# Altium PCB ADS1299-V3.PcbDoc (part 2 of 3)
Units mm, origin at the board's own origin, x right, y up, seen from the top; angles counter-clockwise.
Board outline 93.01 x 69.99 mm, 4 copper layers (Top, GND, POWER, Bottom), stack 0.603 mm thick; 198 components, 137 nets, 685 pads, 384 vias.
Unrouted connection lines stored in the file: 1.
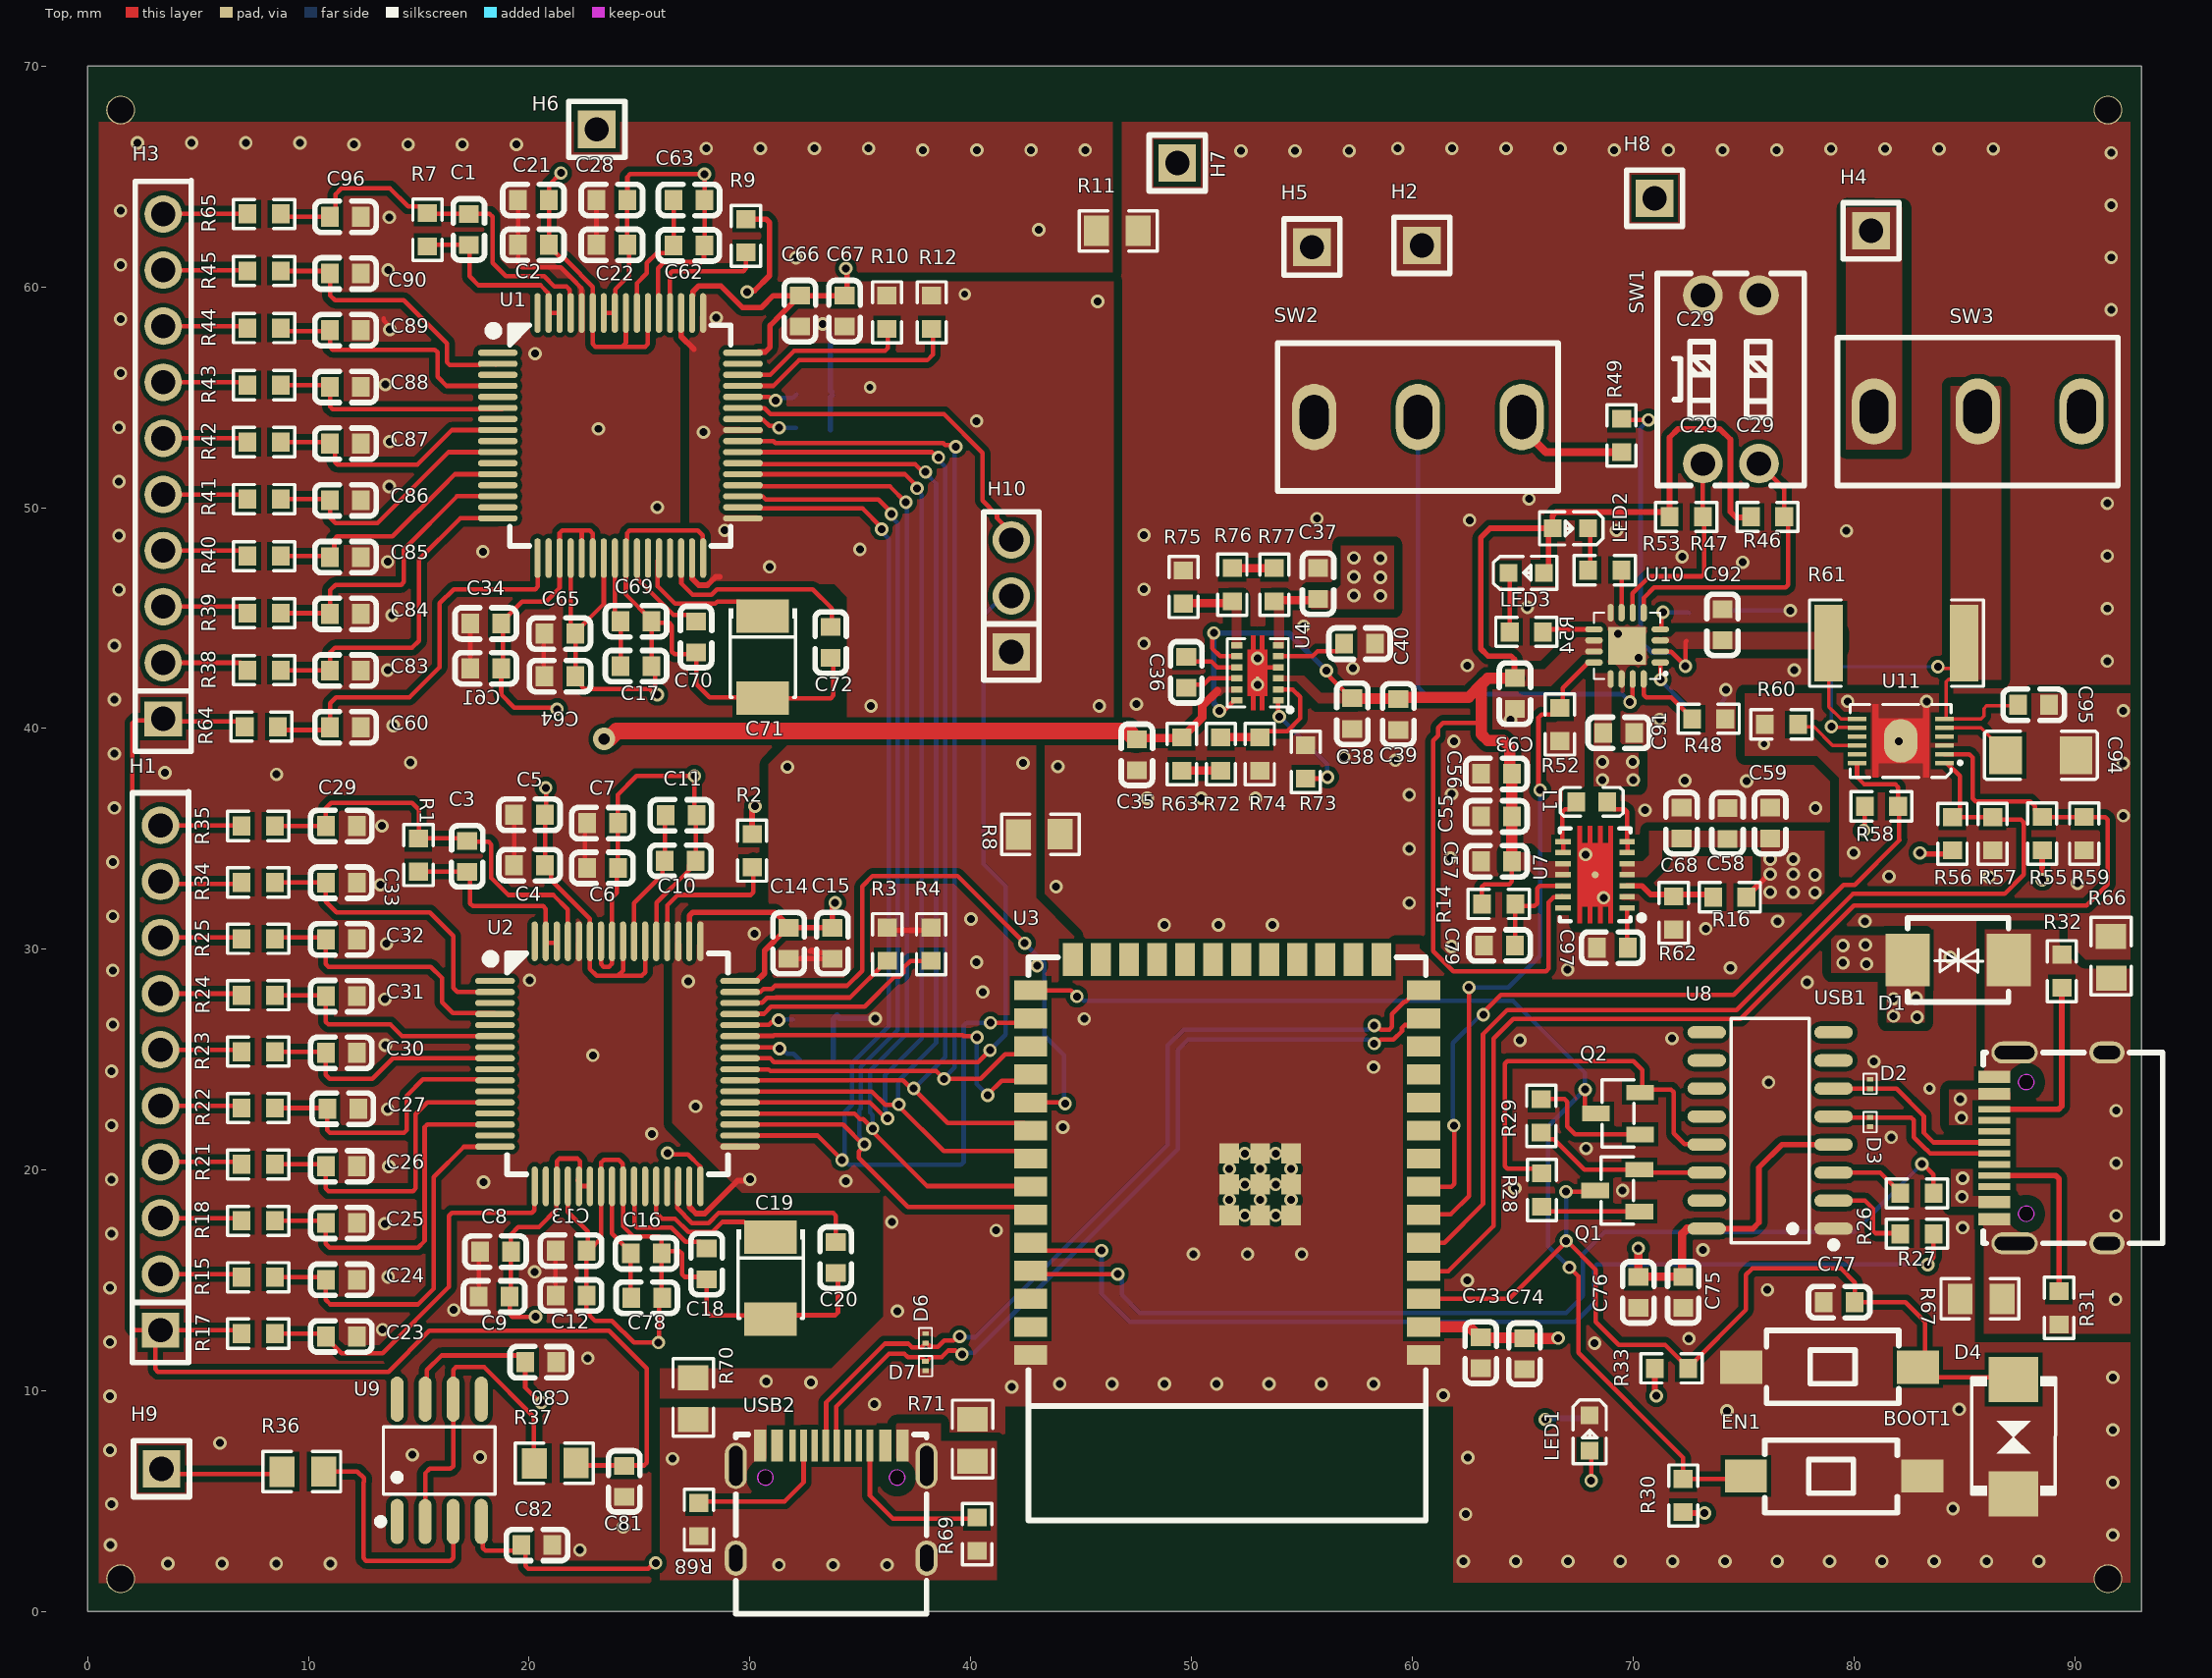
[diagram p0: Top view]

## Via types
v1: diameter 0.61, hole 0.356, Top to Bottom, tented both sides, 357 vias
v2: diameter 0.61, hole 0.356, Top to Bottom, 22 vias
v3: diameter 0.559, hole 0.305, Top to Bottom, 4 vias
v4: diameter 1.016, hole 0.508, Top to Bottom, tented both sides, 1 vias

## Nets (pads, with @x,y where several pads share a name; then routed paths per layer and width w, separated by ;. In a path a pad name is that pad's centre, name@x,y a point inside that pad or via, vN(x,y) a via of type N, cw(c..) or ccw(c..) an arc to the next point about the centre after c; other vN are vias at no path point) (continued)
AVSS: (continued)
  Top w0.203: U9.4@17.831,4.086 17.904,4.012 17.904,2.888 18.023,2.769 19.403,2.769 C82.1@19.657,3.023 19.837,2.842 19.837,2.075 19.956,1.956 25.4,1.956 v1@25.603,2.159 ; U2.20@21.753,19.266 21.753,18.114 22.651,17.215 C13.1@22.651,16.185 ; U1.20@21.88,47.714 21.88,44.465 C65.1@22.022,44.323 ; C65.1@22.123,44.12 22.098,44.094 C64.1@22.098,42.367 22.396,42.069 22.396,41.902 22.515,41.783 25.451,41.783 25.546,41.688 25.551,41.688 25.73,41.509 v1@25.73,41.504 ; C65.1@22.2,44.221 22.2,44.46 23.38,45.641 U1.23@23.38,47.714 ; C13.1@22.595,16.129 22.595,13.571 22.983,13.183 23.752,13.183 24.742,12.192 25.883,12.192 25.883,14.083 C78.1@26.024,14.224 25.998,14.249 C16.1@25.998,16.231 ; C13.1@22.936,16.586 23.253,16.903 U2.23@23.253,19.266 ; U2.23@23.241,19.685 23.268,19.712 23.268,20.347 23.392,20.471 24.056,20.471 24.238,20.288 24.238,19.281 U2.25@24.253,19.266 24.253,17.456 24.718,16.99 25.879,16.99 25.998,16.871 C16.1@25.998,16.231 ; U2.58@23.253,30.366 23.253,29.329 23.372,29.21 23.619,29.21 23.738,29.329 23.738,30.351 U2.57@23.753,30.366 23.753,32.338 23.978,32.563 C6.1@23.978,33.655 ; U1.58@23.38,58.814 U1.57@23.88,58.814 23.895,58.828 23.895,59.887 24.531,60.523 24.531,61.818 C22.1@24.449,61.9 ; C6.1@24.017,33.68 C7.1@24.017,35.712 24.017,36.997 24.867,37.846 v1@27.457,37.846 ; U1.25@24.384,48.514 24.435,48.565 24.435,48.844 24.554,48.963 27.643,48.963 27.865,48.741 27.865,47.729 U1.32@27.88,47.714 ; U1.25@24.395,47.843 24.38,47.828 24.38,46.068 25.541,44.906 C69.1@25.541,44.856 25.617,44.78 26.348,44.78 26.467,44.661 26.467,43.477 26.586,43.358 27.432,43.358 C70.1@27.508,43.434 ; C22.1@24.435,61.982 C28.1@24.435,63.932 ; C28.1@24.449,63.932 24.449,64.981 24.568,65.1 27.915,65.1 v1@27.94,65.126 ; C69.1@25.541,44.791 C17.1@25.541,42.824 25.705,42.661 v1@25.705,41.605 ; U2.53@25.753,30.366 25.768,30.38 25.768,32.114 27.249,33.595 27.249,33.803 C10.2@27.503,34.056 ; U1.53@25.865,58.771 25.865,59.609 25.832,59.643 25.832,60.841 26.107,61.117 27.796,61.117 27.915,61.236 27.915,61.86 C62.2@27.929,61.874 ; v1@26.373,20.709 27.199,20.709 27.738,20.17 27.738,19.281 U2.32@27.753,19.266 ; C10.2@27.548,34.011 C11.2@27.548,36.068 ; C70.1@27.559,43.445 27.565,43.445 27.565,42.005 28.169,41.402 C71.2@30.582,41.402 ; C11.2@27.573,36.068 27.483,36.158 27.483,37.682 27.545,37.744 v1@27.61,37.744 ; C62.2@27.94,61.925 C63.2@27.94,63.932 v1@27.94,65.075 ; C18.1@27.991,15.164 27.043,15.164 26.924,15.283 26.924,16.213 26.805,16.332 26.1,16.332 C16.1@25.998,16.231 ; C18.1@28.042,15.048 28.042,13.589 28.219,13.411 30.778,13.411 C19.2@30.937,13.252 ; C71.2@30.582,41.37 33.663,41.37 33.782,41.489 33.782,43.18 C72.1@33.655,43.307 ; C19.2@30.988,13.252 31.166,13.43 33.866,13.43 33.985,13.549 C20.1@33.985,15.316
  Top w0.381: R77.1@53.746,45.754 53.798,45.806 55.743,45.806 C37.1@55.804,45.745
  other v1: 25.73,2.21 25.857,12.192 26.264,20.777 27.483,37.846 25.806,41.529 58.548,46.005 57.353,46.025 58.548,46.844 57.353,46.863 58.548,47.707 57.353,47.727 27.94,65.1
BIA: H1.10 R35.2 | length 3.7
  Top w0.203: H1.10@3.302,35.611 R35.2@6.96,35.611
BIA2: H3.10 R65.2 | length 3.4
  Top w0.203: H3.10@3.912,63.246 3.962,63.297 R65.2@7.248,63.297
BIAS: C3.1 C29.2 R1.1 R35.1 U2.61 | length 19.3
  Top w0.203: R35.1@8.489,35.583 C29.2@10.792,35.583 10.792,36.395 11.024,36.627 14.707,36.627 15.011,36.322 R1.1@15.011,35.023 ; R1.1@14.986,35.023 R1.1@15.011,35.023 ; C3.1@16.916,35.001 17.051,34.866 18.169,34.866 18.288,34.747 18.288,33.223 19.05,32.461 21.091,32.461 21.753,31.8 U2.61@21.753,30.366 ; C3.1@16.916,35.023 R1.1@15.011,35.023
BIAS2: C1.1 C96.2 R7.1 R65.1 U1.61 | length 17.9
  Top w0.203: R65.1@9.017,63.297 9.017,63.209 9.056,63.17 C96.2@10.984,63.17 ; C96.2@11.055,63.099 11.227,63.271 11.227,64.186 11.506,64.465 13.691,64.465 14.515,63.641 15.091,63.641 R7.1@15.392,63.339 ; R7.1@15.494,63.297 C1.1@17.272,63.297 18.22,63.297 18.339,63.178 18.339,61.087 18.948,60.477 20.68,60.477 21.137,60.02 21.692,60.02 21.844,59.868 U1.61@21.844,58.928
CH_ADC: R52.2 U3.6 U10.12 | length 30.3
  Top w0.203: U3.6@60.706,18.009 61.747,18.009 62.56,18.821 v1(62.56,28.27) ; v1@65.659,37.186 65.71,37.236 65.71,40.488 65.857,40.635 66.373,40.635 R52.2@66.675,40.936 66.802,41.063 66.802,41.828 67.963,42.989 U10.12@68.223,42.989
  Bottom w0.203: v1(62.56,28.27) 64.338,28.27 65.786,29.718 v1(65.786,37.211)
CLK: U1.37 U2.37 | length 44.5
  Top w0.203: U2.37@29.553,23.066 35.43,23.066 36.152,22.345 v1(36.229,22.345) ; U1.37@29.68,51.514 37.025,51.514 37.567,50.972 v1(37.567,50.876)
  Bottom w0.203: v1(36.229,22.345) 36.152,22.422 36.152,22.703 36.119,22.736 36.119,24.308 37.77,25.959 37.77,50.577 37.567,50.78 v1(37.567,50.876)
D+: D3.2 U8.5 USB1.A6 | length 8.4
  Top w0.203: U8.5@79.072,22.428 79.114,22.387 82.583,22.387 82.702,22.268 82.702,21.488 83.261,20.93 83.275,20.93 83.448,20.756 USB1.A6@86.353,20.756
D-: D2.2 U8.6 USB1.A7 | length 8.4
  Top w0.203: U8.6@79.072,23.698 80.722,23.698 D2.2@80.848,23.698 ; D2.2@80.848,23.689 81.924,23.689 83.16,22.454 83.16,21.692 83.595,21.256 USB1.A7@86.036,21.256